# Altium PCB Copy of PCB1.PcbDoc (part 4 of 4)
Units mm, origin at the board's own origin, x right, y up, seen from the top; angles counter-clockwise.
Board outline 200 x 135 mm, 2 copper layers (Top Layer, Bottom Layer); 350 components, 150 nets, 843 pads, 244 vias.
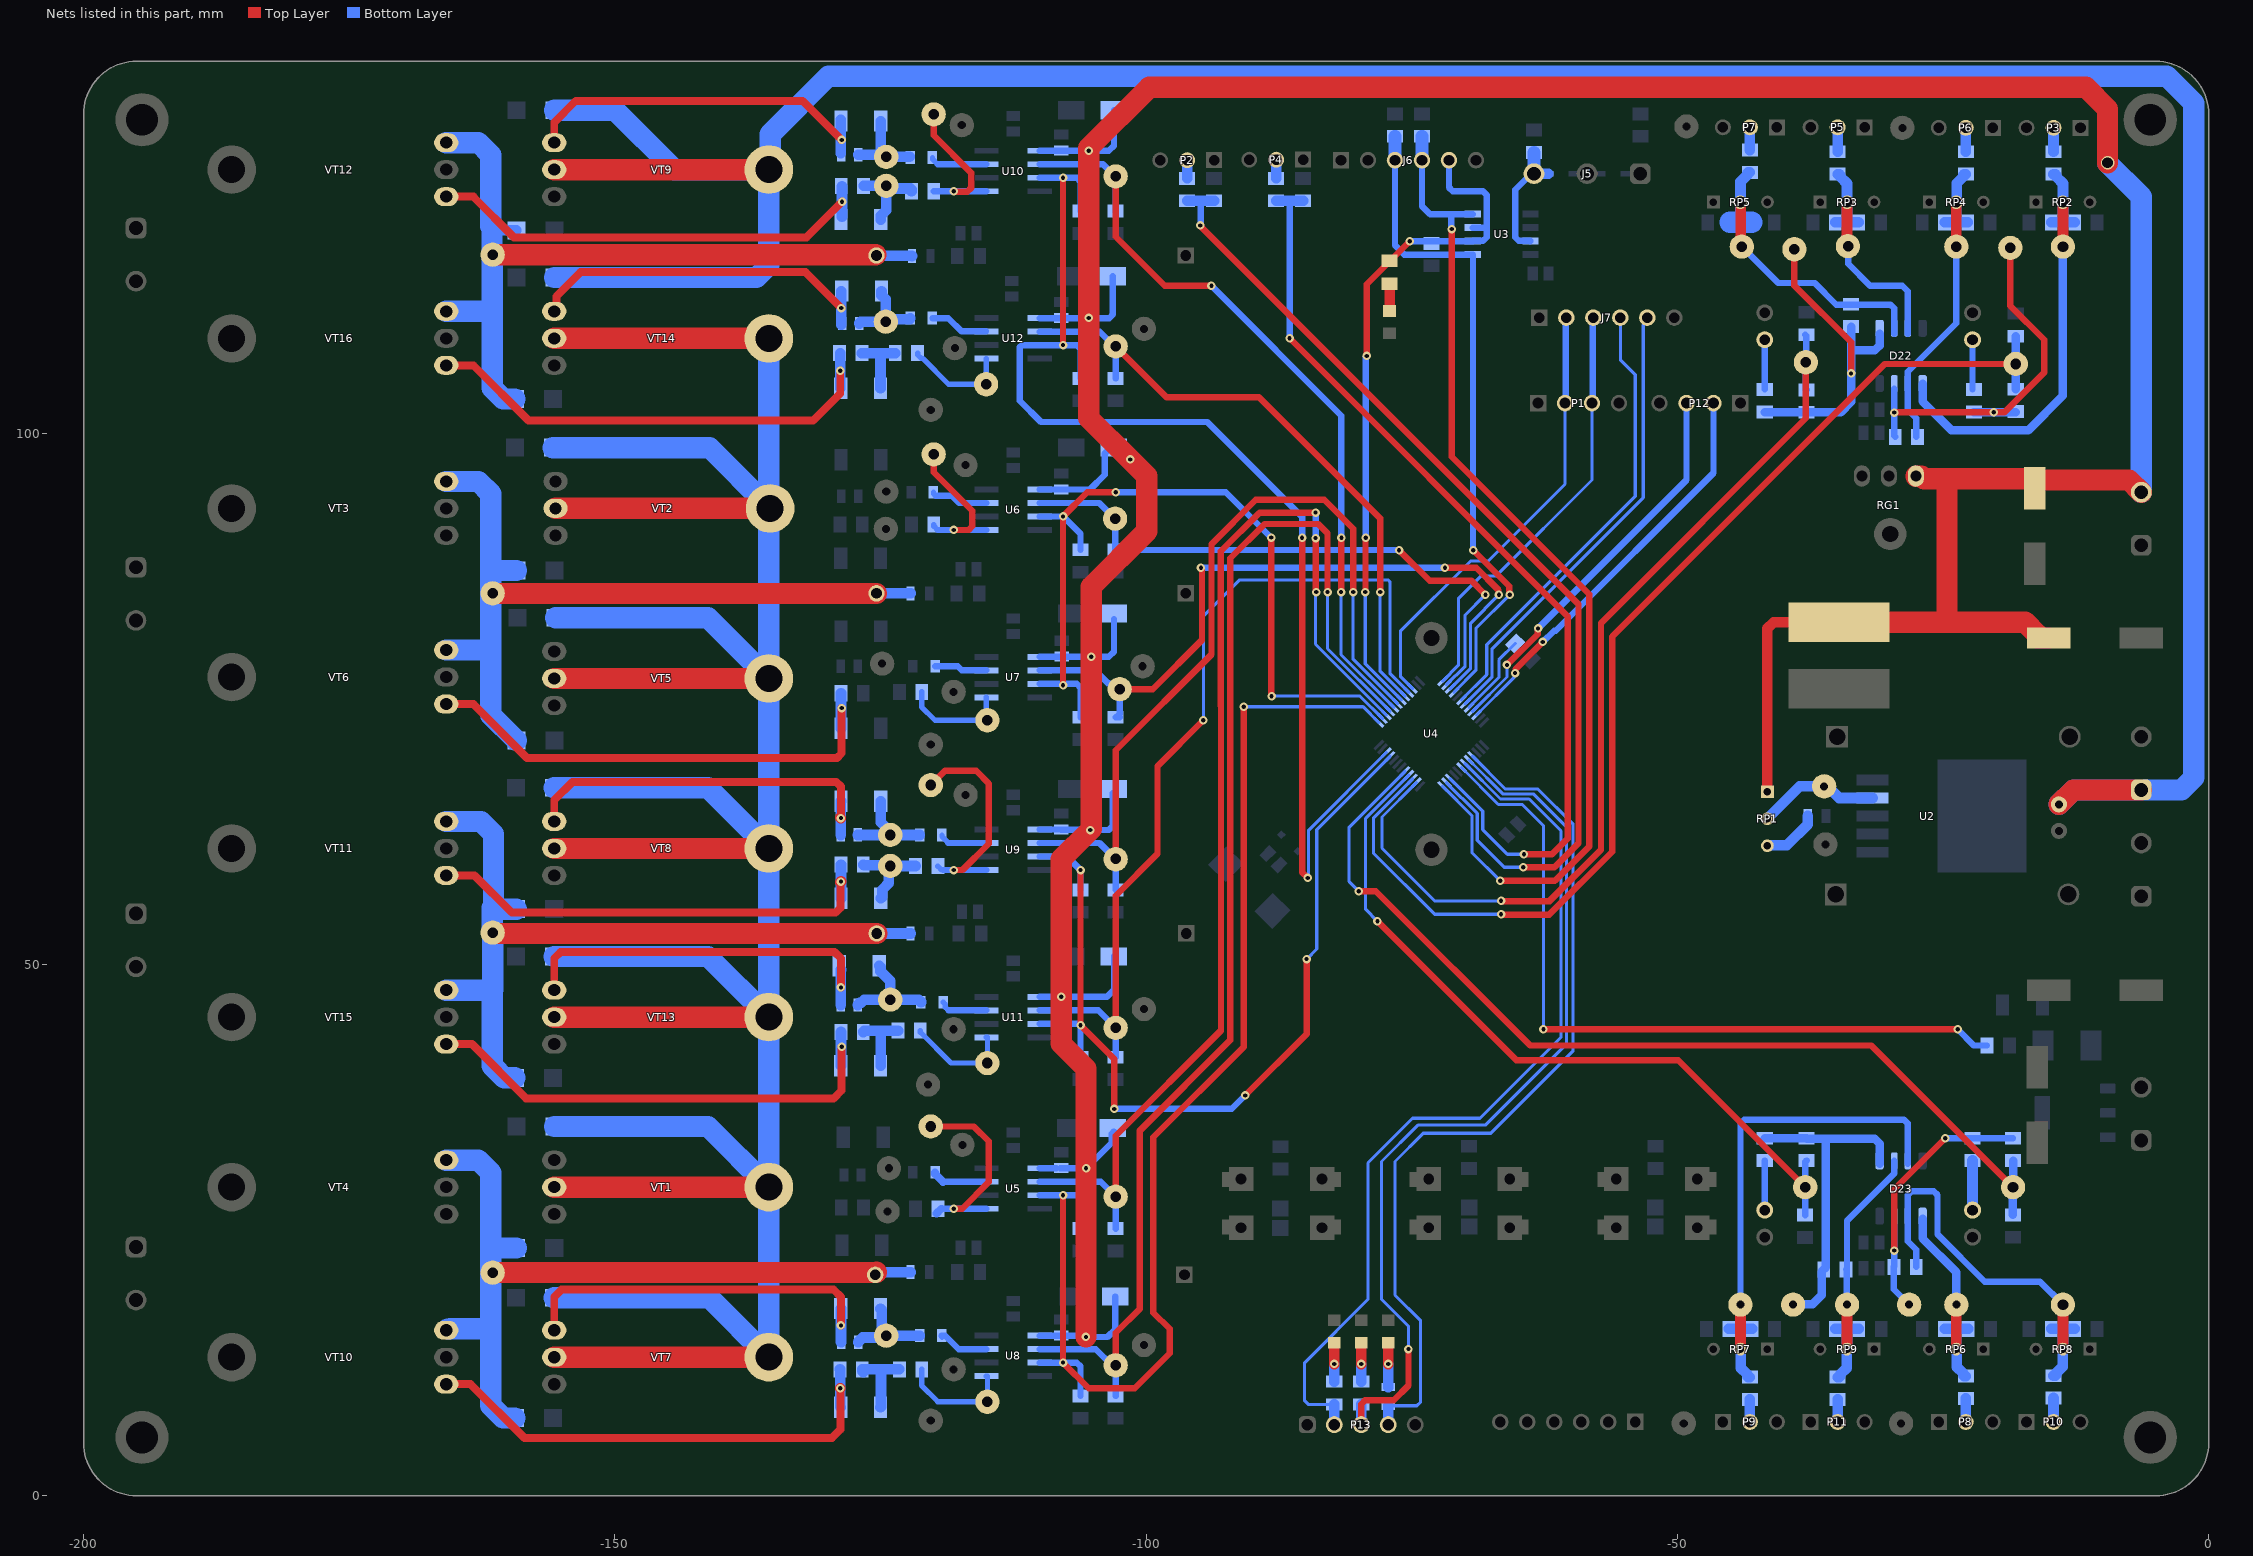
[diagram p3: the nets of this part, all layers, seen from the top]

## Via types
v1: diameter 0.8, hole 0.4, Top Layer to Bottom Layer, tented both sides, 119 vias
v2: diameter 1.27, hole 1, Top Layer to Bottom Layer, 115 vias
v3: diameter 1.8, hole 1, Top Layer to Bottom Layer, tented both sides, 6 vias
v4: diameter 1.27, hole 0.711, Top Layer to Bottom Layer, 3 vias
v5: diameter 0.8, hole 0.4, Top Layer to Bottom Layer, 1 vias

## Nets (pads, with @x,y where several pads share a name; then routed paths per layer and width w, separated by ;. In a path a pad name is that pad's centre, name@x,y a point inside that pad or via, vN(x,y) a via of type N, cw(c..) or ccw(c..) an arc to the next point about the centre after c; other vN are vias at no path point) (continued)
NetD9_2: D9.2 R27.1 VT6.G | length 47
  Top Layer w0.75: VT6.G@-165.862,74.509 -163.322,74.509 -158.256,69.443 -129.09,69.443 -128.651,69.882 v1(-128.651,74.128)
  Bottom Layer w1: R27.1@-128.721,75.525 -128.719,75.524 -128.719,72.224 D9.2@-128.718,72.223
NetD13_1: D13.1 R31.1 R34.2 TP35.1 | length 8.8
  Bottom Layer w1: R31.1@-127.087,14.438 -127.087,14.473 -126.665,14.895 -124.638,14.895 v2(-124.46,15.073) ; D13.1@-124.998,17.613 -124.873,17.488 -124.873,15.834 -124.46,15.421 v2(-124.46,15.073) ; R34.2@-121.319,15.073 v2(-124.46,15.073)
NetD13_2: D13.2 R31.2 VT7.G | length 36.5
  Top Layer w0.75: VT7.G@-155.702,15.581 -155.702,18.702 -155.013,19.391 -129.408,19.391 -128.72,18.702 v1(-128.72,16.026)
  Bottom Layer w1: D13.2@-128.748,17.613 -128.72,17.584 v1(-128.72,16.026) -128.72,14.467 R31.2@-128.691,14.438
NetD14_1: D14.1 R41.1 R43.2 TP49.1 | length 9.4
  Bottom Layer w1: R41.1@-127.127,62.19 v2(-124.079,62.19) ; D14.1@-124.968,65.365 -124.968,63.37 -124.079,62.481 v2(-124.079,62.19) ; R43.2@-121.319,62.19 v2(-124.079,62.19)
NetD14_2: D14.2 R41.2 VT8.G | length 36.1
  Top Layer w0.75: VT8.G@-155.702,63.46 -155.702,65.474 -153.991,67.185 -129.164,67.185 -128.724,66.746 v1(-128.724,63.778)
  Top Layer w1: v1@-128.778,63.831 v1(-128.724,63.778)
  Bottom Layer w1: R41.2@-128.731,62.19 -128.724,62.196 v1(-128.724,63.778) -128.724,65.359 D14.2@-128.718,65.365
NetD15_1: D15.1 R42.1 R44.2 TP50.1 | length 8.4
  Bottom Layer w1: R42.1@-127.087,126.198 -124.658,126.198 v4(-124.46,126) R44.2@-122.264,126 ; D15.1@-124.968,129.373 -124.968,126.856 -124.516,126.404 TP50.1@-124.516,126.056
  other v2: -124.46,126
NetD15_2: D15.2 R42.2 VT9.G | length 34.5
  Top Layer w0.75: VT9.G@-155.702,127.341 -155.702,129.248 -153.672,131.278 -132.334,131.278 v1(-128.651,127.595)
  Bottom Layer w1: R42.2@-128.748,126.329 D15.2@-128.748,129.5
NetD16_1: D16.1 R45.1 R48.2 | length 7.1
  Bottom Layer w1: R48.2@-126.608,11.644 -126.711,11.747 R48.2@-126.711,11.898 -124.95,11.898 R45.1@-123.225,11.898 ; D16.1@-124.998,8.342 -124.95,8.39 -124.95,11.644
NetD16_2: D16.2 R48.1 VT10.G | length 47
  Top Layer w0.75: VT10.G@-165.862,10.501 -163.576,10.501 -158.51,5.435 -129.584,5.435 -128.778,6.241 v1@-128.778,10.118
  Top Layer w1: v1(-128.78,10.12) v1@-128.778,10.118
  Bottom Layer w1: R48.1@-128.813,11.898 -128.78,11.866 v1(-128.78,10.12) -128.78,8.374 D16.2@-128.748,8.342
NetD17_1: D17.1 R51.1 R59.2 TP53.1 | length 8.4
  Bottom Layer w1: R59.2@-126.619,59.396 -126.556,59.333 -124.143,59.333 v2(-124.079,59.269) ; D17.1@-124.968,56.221 -124.843,56.346 -124.843,57.044 -124.218,57.67 -124.218,59.13 v2(-124.079,59.269) ; R51.1@-121.701,59.269 v2(-124.079,59.269)
NetD17_2: D17.2 R59.1 VT11.G | length 44.4
  Top Layer w0.75: VT11.G@-165.862,58.38 -163.195,58.38 -159.69,54.875 -129.217,54.875 -128.778,55.314 v1@-128.778,57.75
  Top Layer w1: v1@-128.778,57.75 v1(-128.719,57.809)
  Bottom Layer w1: R59.1@-128.721,59.396 -128.719,59.395 v1(-128.719,57.809) -128.719,56.222 D17.2@-128.718,56.221
NetD18_1: D18.1 R52.1 R60.2 TP54.1 | length 8.2
  Bottom Layer w1: R60.2@-126.584,123.277 v2(-124.46,123.277) ; D18.1@-124.968,120.102 -124.968,120.477 -124.46,120.985 v2(-124.46,123.277) ; R52.1@-122.082,122.769 -122.082,122.92 -122.193,123.031 -124.214,123.031 v2(-124.46,123.277)
NetD18_2: D18.2 R60.1 VT12.G | length 43.1
  Top Layer w0.75: VT12.G@-165.862,122.261 -163.322,122.261 -159.49,118.429 -131.976,118.429 v1(-128.621,121.784)
  Bottom Layer w1: D18.2@-128.621,120.356 v1(-128.621,121.784) R60.1@-128.621,123.212
NetD21_1: D21.1 R65.1 R75.2 TP59.1 | length 9.9
  Bottom Layer w1: R65.1@-127.127,46.188 -127.031,46.284 -127.031,46.319 -126.935,46.415 -126.822,46.415 -126.541,46.696 v2(-124.079,46.696) ; D21.1@-125.125,49.871 -125,49.746 -125,49.371 -124.079,48.45 v2(-124.079,46.696) ; R75.2@-121.192,46.442 -121.192,46.492 -121.396,46.696 v2(-124.079,46.696)
NetD21_2: D21.2 R65.2 VT13.G | length 36.5
  Top Layer w0.75: VT13.G@-155.702,47.585 -155.702,50.579 -155.096,51.185 -129.33,51.185 -128.724,50.579 v1(-128.724,47.839)
  Bottom Layer w1: R65.2@-128.731,46.188 -128.724,46.194 v1(-128.724,47.839) -128.724,49.484 D21.2@-128.718,49.49
NetD22_1: D22.1 R54.2 R63.2 R64.2 TP6.1 | length 33.5
  Top Layer w0.6: v2(-38.989,117.308) -38.989,113.879 -33.655,108.545 v1(-33.655,105.624)
  Bottom Layer w0.8: R63.2@-41.783,101.976 R64.2@-37.846,101.976 -34.636,101.976 -33.655,102.957 v1(-33.655,105.624) -33.655,107.783 ; R54.2@-33.655,110.034 -33.655,107.783 ; D22.1@-30.981,109.367 -30.981,108.252 -31.45,107.783 -33.655,107.783
NetD22_2: D22.2 R54.1 R73.2 R74.1 R77.1 RP5.2 TP12.1 | length 30.6
  Top Layer w1: v2(-44.069,121.753) -44.031,121.715 -44.031,117.651 v2(-43.942,117.562)
  Bottom Layer w0.6: v2(-43.942,117.562) -40.513,114.133 -37.084,114.133 -35.052,112.101 -29.942,112.101 -29.591,111.75 D22.2@-29.591,109.875 D22.2@-29.591,109.367
  Bottom Layer w1: -44.023,119.848 -44.069,119.894 -44.069,123.658 -43.434,124.293 -43.434,124.444 -43.331,124.547 R73.2@-43.18,124.547
  Bottom Layer w2: R74.1@-45.05,119.848 -44.023,119.848 R77.1@-42.996,119.848
NetD22_3: D22.3 R57.2 R58.1 R67.2 RP3.2 TP10.1 | length 23.7
  Top Layer w1: v2(-34.036,121.753) -34.036,117.689 TP10.1@-33.953,117.606
  Bottom Layer w0.6: D22.3@-28.321,109.367 -28.321,113.371 -28.829,113.879 -31.877,113.879 -33.934,115.936 v2(-33.934,117.587) ; v2(-33.934,117.587) TP10.1@-33.953,117.606 v2(-33.934,117.587)
  Bottom Layer w1: R58.1@-35.144,119.848 -34.036,119.848 ; R57.2@-34.925,124.385 -34.774,124.385 -34.671,124.282 -34.671,124.131 -34.036,123.496 v2(-34.036,121.753) -34.036,119.848 ; R67.2@-32.963,119.848 -34.036,119.848
NetD22_5: D22.5 R55.2 R56.1 R66.2 RP2.2 TP9.GG | length 42.8
  Top Layer w1: v2(-13.716,117.562) v2(-13.716,121.753)
  Bottom Layer w0.8: D22.5@-26.931,104.675 -26.931,102.994 -24.212,100.275 -16.975,100.275 -13.716,103.534 v2(-13.716,117.562)
  Bottom Layer w1: R56.1@-14.824,119.848 -13.716,119.848 ; R55.2@-14.605,124.385 -14.454,124.385 -14.351,124.282 -14.351,124.131 -13.716,123.496 v2(-13.716,121.753) -13.716,119.848 ; R66.2@-12.608,119.848 -13.716,119.848
NetD22_6: D22.6 R53.1 R71.2 R72.1 R76.1 RP4.2 TP11.1 | length 31.5
  Top Layer w1: v2(-23.749,117.562) v2(-23.749,121.748)
  Bottom Layer w0.6: R53.1@-27.524,99.655 -27.524,101.398 -28.321,102.195 D22.6@-28.321,104.675 -28.321,105.781 -23.749,110.353 v2(-23.749,117.562)
  Bottom Layer w1: R72.1@-24.857,119.848 -23.766,119.848 ; R71.2@-22.86,124.385 -23.011,124.385 -23.114,124.282 -23.114,124.131 -23.711,123.534 -23.711,121.786 v2(-23.749,121.748) -23.749,119.865 -23.766,119.848 ; R76.1@-22.676,119.848 -23.766,119.848
NetD22_7: D22.7 R53.2 R61.2 R62.2 TP5.1 | length 37.2
  Top Layer w0.6: v1(-29.591,101.941) -29.574,101.958 -20.245,101.958 v1(-20.228,101.976) -19.224,101.976 -15.494,105.706 -15.494,108.799 -18.669,111.974 v2(-18.669,117.435)
  Bottom Layer w0.6: D22.7@-29.591,104.167 -29.591,99.747 R53.2@-29.499,99.655
  Bottom Layer w0.8: R61.2@-22.098,101.976 v1(-20.228,101.976) R62.2@-18.161,101.976
NetD23_1: D23.1 R84.2 R90.2 R92.2 TP16.1 | length 30.8
  Bottom Layer w0.8: R90.2@-41.783,33.65 R92.2@-37.846,33.65 ; TP16.1@-39.116,17.994 -39.085,18.025 -37.275,18.025 -36.433,18.867 -36.433,21.093 -36.027,21.499 -36.027,33.615 ; R92.2@-37.846,33.615 -36.027,33.615 ; D23.1@-30.981,31.262 -30.981,33.146 -31.45,33.615 -36.027,33.615
NetD23_2: D23.2 R84.1 R98.2 R100.1 R102.1 RP9.2 TP22.1 | length 26.8
  Top Layer w1: RP9.2@-34.036,13.803 TP22.1@-34.036,17.994
  Bottom Layer w0.6: R84.1@-34.128,21.296 -34.036,21.204 -34.082,21.158 -34.082,18.04 TP22.1@-34.036,17.994 ; R84.1@-34.036,21.296 -34.036,25.889 -29.591,30.334 D23.2@-29.591,31.516
  Bottom Layer w1: R102.1@-35.144,15.708 -34.036,15.708 ; R98.2@-34.925,11.171 -34.774,11.171 -34.671,11.274 -34.671,11.425 -34.074,12.022 -34.074,13.765 RP9.2@-34.036,13.803 -34.036,15.708 ; R100.1@-32.928,15.708 -34.036,15.708
NetD23_3: D23.3 R86.2 R88.1 R94.2 RP7.2 TP20.1 | length 48.3
  Top Layer w1: RP7.2@-44.069,13.803 TP20.1@-44.069,17.994
  Bottom Layer w0.6: TP20.1@-44.069,17.994 -44.069,35.042 -43.718,35.393 -28.672,35.393 -28.321,35.042 D23.3@-28.321,31.262
  Bottom Layer w1: R94.2@-45.177,15.708 -44.069,15.708 ; R86.2@-43.18,11.171 -43.331,11.171 -43.434,11.274 -43.434,11.425 -44.031,12.022 -44.031,13.765 RP7.2@-44.069,13.803 -44.069,15.708 ; R88.1@-42.961,15.708 -44.069,15.708
NetD23_5: D23.5 R85.2 R87.1 R93.2 RP6.2 TP19.1 | length 20.7
  Top Layer w1: RP6.2@-23.749,13.803 TP19.1@-23.749,17.994
  Bottom Layer w0.8: D23.5@-26.931,26.062 -26.931,24.224 -23.749,21.042 TP19.1@-23.749,17.994
  Bottom Layer w1: R93.2@-24.857,15.708 -23.749,15.708 ; R85.2@-22.86,11.263 -23.011,11.263 -23.114,11.366 -23.114,11.517 -23.711,12.114 -23.711,13.765 RP6.2@-23.749,13.803 -23.749,15.708 ; R87.1@-22.641,15.708 -23.749,15.708
NetD23_6: D23.6 R83.1 R97.2 R99.1 R101.1 RP8.2 TP21.1 | length 39.6
  Top Layer w1: RP8.2@-13.716,13.803 v2(-13.716,17.994)
  Bottom Layer w0.6: R83.1@-27.524,21.55 -27.524,23.166 -28.321,23.963 -28.321,28.311 -27.97,28.662 -25.878,28.662 -25.527,28.311 -25.527,24.598 -21.082,20.153 -15.875,20.153 v2(-13.716,17.994)
  Bottom Layer w1: R101.1@-14.824,15.708 R99.1@-12.608,15.708 ; R97.2@-14.605,11.298 -14.454,11.298 -14.351,11.401 -14.351,11.552 -13.754,12.149 -13.754,13.765 RP8.2@-13.716,13.803 -13.716,15.614
NetD23_7: D23.7 R83.2 R89.2 R91.2 TP15.1 | length 27.6
  Top Layer w0.6: v1(-29.591,23.074) -29.591,28.859 v1(-24.8,33.65)
  Bottom Layer w0.6: D23.7@-29.591,26.062 v1(-29.591,23.074) -29.591,21.585 R83.2@-29.626,21.55 -29.626,19.426 TP15.1@-28.194,17.994 ; v1(-24.8,33.65) R89.2@-22.225,33.65 R91.2@-18.415,33.65
NetD24_1: D24.1 R68.1 R78.2 TP60.1 | length 8.1
  Bottom Layer w1: R68.1@-127,110.323 -127,110.358 -126.858,110.5 v2(-124.5,110.5) ; D24.1@-124.901,113.371 -124.901,112.996 -124.5,112.595 v2(-124.5,110.5) ; R78.2@-122.208,110.831 -122.258,110.781 -122.258,110.736 -124.264,110.736 v2(-124.5,110.5)
NetD24_2: D24.2 R68.2 VT14.G | length 33.8
  Top Layer w0.75: VT14.G@-155.702,111.466 -155.504,111.664 -155.504,112.871 -153.226,115.149 -132.07,115.149 v1(-128.691,111.77)
  Bottom Layer w1: R68.2@-128.691,110.196 v1(-128.691,111.77) D24.2@-128.691,113.344
NetD25_1: D25.1 R103.1 R105.2 | length 6.5
  Bottom Layer w1: R105.2@-126.619,43.648 -126.619,43.672 -126.516,43.775 -124.968,43.775 R103.1@-123.352,43.775 ; D25.1@-124.968,40.473 -124.968,43.648
NetD25_2: D25.2 R105.1 VT15.G | length 46.9
  Top Layer w0.75: VT15.G@-165.862,42.505 -163.449,42.505 -158.341,37.397 -129.408,37.397 -128.651,38.154 v1(-128.651,42.251)
  Bottom Layer w1: R105.1@-128.721,43.648 -128.719,43.647 -128.719,42.251 -128.719,40.474 D25.2@-128.718,40.473
NetD26_1: D26.1 R104.1 R106.2 | length 6.4
  Bottom Layer w1: R106.2@-126.746,107.529 -124.998,107.529 ; D26.1@-124.998,104.227 -124.998,107.529 ; R104.1@-123.606,107.529 -124.998,107.529
NetD26_2: D26.2 R106.1 VT16.G | length 45.7
  Top Layer w0.75: VT16.G@-165.862,106.386 -163.322,106.386 -158.129,101.193 -131.332,101.193 -128.787,103.738 v1(-128.787,105.878)
  Bottom Layer w1: D26.2@-128.787,104.236 v1(-128.787,105.878) R106.1@-128.787,107.52
NetD29_1: D29.1 R113.1 | length 4.2
  Top Layer w1: v1(-77.216,12.406) D29.1@-77.216,14.404
  Bottom Layer w1: R113.1@-77.216,10.221 v1(-77.216,12.406)
NetD30_1: D30.1 R114.1 | length 3.7
  Top Layer w1: v1(-79.756,12.406) D30.1@-79.756,14.404
  Bottom Layer w1: R114.1@-79.756,10.748 v1(-79.756,12.406)
NetD31_1: D31.1 R115.1 | length 3.7
  Top Layer w1: v1(-82.296,12.406) D31.1@-82.296,14.404
  Bottom Layer w1: R115.1@-82.296,10.748 v1(-82.296,12.406)
NetD32_2: D32.2 D34.2 R29.2 R30.2 TP43.1 VT4.S VT10.S | length 75.2
  Top Layer w2: TP43.1@-161.544,21.042 -161.522,21.02 -125.398,21.02 R29.2@-125.376,21.042
  Bottom Layer w1: R29.2@-125.503,20.788 -125.398,20.893 -125.009,20.893 -124.86,21.042 R30.2@-122.161,21.042
  Bottom Layer w2: VT4.S@-165.862,31.583 -162.843,31.583 -161.812,30.553 ; VT10.S@-165.719,15.692 -165.497,15.692 -165.481,15.708 -161.671,15.708 ; -161.671,30.411 -161.671,21.248 -161.5,21.077 -161.5,20.923 -161.671,20.752 -161.671,15.708 ; -161.471,23.382 -161.417,23.328 D32.2@-159.282,23.328 ; D34.2@-159.409,7.326 -160.499,7.326 -161.671,8.498 -161.671,15.708
  other v2: -161.5,21
NetD36_2: D36.2 D38.2 R107.2 R108.2 TP67.1 VT11.S VT15.S | length 75.1
  Top Layer w2: TP67.1@-161.544,52.919 v2(-125.349,52.919)
  Bottom Layer w1: v2(-125.349,52.919) R108.2@-122.161,52.919
  Bottom Layer w2: VT15.S@-165.862,47.585 -161.544,47.585 ; VT11.S@-165.862,63.46 -162.589,63.46 -161.417,62.288 -161.417,55.205 D36.2@-159.282,55.205 ; -161.544,40.473 -161.544,47.585 ; TP67.1@-161.544,53 -161.544,55.332 ; v2(-161.5,53) -161.5,47.629 -161.544,47.585 ; -161.403,40.332 -160.401,39.33 D38.2@-159.409,39.33
NetD40_2: D40.2 D42.2 R32.2 R33.2 TP44.1 VT3.S VT6.S | length 74.9
  Top Layer w2: TP44.1@-161.544,84.923 v2(-125.376,84.923)
  Bottom Layer w1: v2(-125.376,84.923) R33.2@-122.161,84.923
  Bottom Layer w2: VT6.S@-165.862,79.589 -161.671,79.589 ; VT3.S@-165.862,95.464 -162.843,95.464 -161.671,94.292 -161.671,87.082 ; TP44.1@-161.671,84.923 -161.671,87.082 ; v2(-161.5,84.923) -161.5,84.846 -161.671,84.675 -161.671,79.589 ; D42.2@-159.27,71.08 -161.671,73.481 -161.671,79.589 ; D40.2@-159.27,87.082 -161.671,87.082
NetD44_2: D44.2 D46.2 R109.2 R110.2 TP68.1 VT12.S VT16.S | length 75
  Top Layer w2: TP68.1@-161.544,116.8 v2(-161.5,116.8) R109.2@-125.453,116.8
  Bottom Layer w1: -161.555,119.351 -161.29,119.086 D44.2@-159.27,119.086 ; v2(-125.376,116.723) -125.351,116.698 -122.059,116.698 R110.2@-122.034,116.673
  Bottom Layer w2: VT16.S@-165.862,111.466 -161.744,111.466 ; VT12.S@-165.862,127.341 -162.843,127.341 -161.671,126.169 -161.671,119.467 -161.555,119.351 -161.555,116.855 v2(-161.5,116.8) TP68.1@-161.5,116.877 ; -161.544,104.256 TP68.1@-161.544,116.679 ; -161.403,104.114 -160.499,103.211 D46.2@-159.409,103.211
NetD47_1: D47.1 R119.1 | length 2.6
  Top Layer w1: D47.1@-77.089,111.5 R119.1@-77.089,114.073
NetJ5_3: J5.3 R5.1 U3.7 Z2.1 | length 11.8
  Bottom Layer w0.6: U3.7@-63.836,118.07 -63.861,118.095 -64.927,118.095 -65.278,118.446 -65.278,122.896 -63.754,124.42 J5.3@-63.5,124.42
  Bottom Layer w1: J5.3@-63.5,124.42 Z2.1@-62.16,124.42
  Bottom Layer w1.2: J5.3@-63.5,124.42 R5.1@-63.5,126.417
NetJ6_3: J6.3 R4.1 U3.1 U4.40 | length 62.7
  Top Layer w0.6: v1@-69.177,88.949 -65.824,85.596 -65.824,84.834 v1(-65.786,84.796)
  Bottom Layer w0.3: U4.40@-71.031,75.604 -68.961,77.674 -68.961,81.621 v1(-65.786,84.796)
  Bottom Layer w0.6: J6.3@-76.581,125.69 -76.581,117.689 -75.692,116.8 U3.1@-69.26,116.8 -69.238,116.778 -69.238,89.01 v1(-69.215,88.987)
  Bottom Layer w1.2: J6.3@-76.581,125.69 R4.1@-76.581,127.941
NetJ6_4: J6.4 R3.1 U3.4 U4.12 | length 97.4
  Top Layer w0.6: v1(-71.247,119.213) -71.247,97.797 -58.293,84.843 -58.293,61.107 -61.528,57.872 v1(-66.675,57.872)
  Bottom Layer w0.3: U4.12@-72.091,66.765 -69.342,64.016 -69.342,60.539 v1(-66.675,57.872)
  Bottom Layer w0.6: J6.4@-74.041,125.69 -74.041,121.372 -73.279,120.61 -71.285,120.61 ; v1(-71.247,119.213) -71.285,119.251 -71.285,120.61 ; U3.4@-69.26,120.61 -71.285,120.61
  Bottom Layer w1.2: J6.4@-74.041,125.69 R3.1@-74.041,127.941
NetJ6_5: J6.5 R9.2 R119.2 U3.2 U3.3 U4.31 | length 65.3
  Top Layer w0.6: v1(-79.375,85.05) -79.35,85.075 -79.35,90.125 v1(-79.325,90.15) ; v1(-79.248,107.275) -79.248,114.006 v1(-75.184,118.07)
  Bottom Layer w0.3: v1(-79.375,85.05) -79.375,78.292 U4.31@-75.98,74.897
  Bottom Layer w0.6: v1(-79.325,90.15) -79.325,107.144 -79.248,107.221 v1(-79.248,107.275) ; v1(-75.184,118.07) U3.2@-69.26,118.07 -69.235,118.095 -68.295,118.095 -67.944,118.446 -67.944,119.34 ; J6.5@-71.501,125.69 -71.501,123.12 -71.15,122.769 -68.295,122.769 -67.944,122.418 -67.944,119.468 -68.072,119.34 U3.3@-69.26,119.34
NetJ7_2: J7.2 P1.2 U4.34 | length 42.8
  Bottom Layer w0.3: U4.34@-74.92,75.958 -76.073,77.111 -76.073,81.367 -69.469,87.971 -67.818,87.971 -60.579,95.21 P1.2@-60.579,102.83 P1.2@-60.516,102.894 ; J7.2@-60.516,110.813 J7.2@-60.452,110.877
  Bottom Layer w0.6: P1.2@-60.516,102.894 J7.2@-60.516,110.813
NetJ7_3: J7.3 P1.3 U4.37 | length 40.9
  Bottom Layer w0.3: U4.37@-72.091,76.665 -70.612,78.144 -70.612,84.415 -68.453,86.574 -67.056,86.574 -58.039,95.591 P1.3@-58.039,102.83 P1.3@-57.976,102.893 ; J7.3@-57.976,110.813 J7.3@-57.912,110.877
  Bottom Layer w0.6: P1.3@-57.976,102.893 J7.3@-57.976,110.813
NetJ7_4: J7.4 U4.42 | length 43.3
  Bottom Layer w0.3: U4.42@-70.324,74.897 -70.324,74.9 -67.945,77.279 -67.945,80.097 -53.975,94.067 -53.975,105.497 -55.372,106.894 J7.4@-55.372,110.877
NetJ7_5: J7.5 U4.43 | length 43.4
  Bottom Layer w0.3: U4.43@-69.97,74.543 -67.437,77.076 -67.437,79.716 -53.213,93.94 -53.213,110.158 -52.832,110.539 J7.5@-52.832,110.877
NetLED1_2: LED1.2 R61.1 | length 4.7
  Bottom Layer w0.6: R61.1@-22.225,104.135 v2(-22.225,108.799)
NetLED2_2: LED2.2 R63.1 | length 4.7
  Bottom Layer w0.6: R63.1@-41.783,104.13 LED2.2@-41.783,108.794
NetLED3_2: LED3.2 R89.1 | length 4.7
  Bottom Layer w1: v2(-22.225,26.884) R89.1@-22.225,31.548
NetLED4_2: LED4.2 R90.1 | length 4.7
  Bottom Layer w0.6: v2(-41.783,26.884) R90.1@-41.783,31.548
NetP2_2: P2.2 R20.2 | length 1.7
  Bottom Layer w1: R20.2@-96.139,123.982 P2.2@-96.139,125.69
NetP3_2: P3.2 R55.1 | length 2.3
  Bottom Layer w1: R55.1@-14.605,126.487 P3.2@-14.605,128.738
NetP4_2: P4.2 R38.2 | length 1.8
  Bottom Layer w1: R38.2@-87.757,123.982 P4.2@-87.757,125.736
NetP5_2: P5.2 R57.1 | length 2.3
  Bottom Layer w1: R57.1@-34.925,126.487 P5.2@-34.925,128.784
NetP6_2: P6.2 R71.1 | length 2.3
  Bottom Layer w1: R71.1@-22.86,126.487 P6.2@-22.86,128.738
NetP7_2: P7.2 R73.1 | length 2.1
  Bottom Layer w1: R73.1@-43.18,126.649 P7.2@-43.18,128.784
NetP8_2: P8.2 R85.1 | length 2.2
  Bottom Layer w1: v2(-22.86,6.945) R85.1@-22.86,9.161
NetP9_2: P9.2 R86.1 | length 2.3
  Bottom Layer w1: P9.2@-43.18,6.818 R86.1@-43.18,9.069
  other v2: -43.18,6.945
NetP10_2: P10.2 R97.1 | length 2.3
  Bottom Layer w1: v2(-14.605,6.945) R97.1@-14.605,9.196
NetP11_2: P11.2 R98.1 | length 2.3
  Bottom Layer w1: P11.2@-34.925,6.818 R98.1@-34.925,9.069
  other v2: -34.925,6.945
NetP12_2: P12.2 U4.46 | length 38.6
  Top Layer w0.6: v1(-65.278,77.43) -65.24,77.468 -65.24,77.775 v1@-62.702,80.313
  Bottom Layer w0.3: U4.46@-68.909,73.483 -65.374,77.018 -65.374,77.334 v1(-65.278,77.43)
  Bottom Layer w0.6: v1(-62.664,80.351) -61.608,81.407 -61.458,81.407 -46.609,96.256 P12.2@-46.609,102.83
NetP12_3: P12.3 U4.45 | length 37.3
  Top Layer w0.6: v1(-66.04,78.192) -63.157,81.075 -63.157,81.583 v1(-63.119,81.621)
  Bottom Layer w0.3: U4.45@-69.263,73.836 -66.04,77.059 v1(-66.04,78.192)
  Bottom Layer w0.6: v1(-63.119,81.621) -49.149,95.591 P12.3@-49.149,102.83
NetP13_2: P13.2 R115.2 U4.6 | length 83.8
  Bottom Layer w0.3: R115.2@-82.296,8.596 -84.739,8.596 -85.09,8.947 -85.09,12.533 -79.121,18.502 -79.121,31.329 -74.93,35.52 -68.58,35.52 -60.96,43.14 -60.96,62.571 -63.96,65.571 -66.655,65.571 U4.6@-69.97,68.887
  Bottom Layer w1: P13.2@-82.296,6.691 R115.2@-82.296,8.596
NetP13_3: P13.3 R114.2 U4.5 | length 85.3
  Top Layer w0.6: P13.3@-79.756,6.691 -79.756,8.626 -79.405,8.977 -76.708,8.977 -75.311,10.374 v1(-75.311,13.803)
  Bottom Layer w0.3: v1(-75.311,13.803) -75.311,15.962 -77.851,18.502 -77.851,31.456 -74.422,34.885 -68.072,34.885 -60.452,42.505 -60.452,62.952 -63.53,66.03 -66.406,66.03 U4.5@-69.616,69.24
  Bottom Layer w1: P13.3@-79.756,6.691 R114.2@-79.756,8.596
NetP13_4: P13.4 R113.2 U4.4 | length 83.1
  Bottom Layer w0.3: R113.2@-77.216,8.469 -74.519,8.469 -74.168,8.82 -74.168,16.47 -76.581,18.883 -76.581,31.456 -73.914,34.123 -67.564,34.123 -59.817,41.87 -59.817,63.206 -63.119,66.508 -66.177,66.508 U4.4@-69.263,69.594
  Bottom Layer w1: P13.4@-77.216,6.691 R113.2@-77.216,8.469
NetR1_2: R1.2 RP1.3 | length 5.4
  Bottom Layer w1: RP1.3@-41.534,61.174 -41.496,61.212 -39.713,61.212 -37.719,63.206 R1.2@-37.719,63.968
NetR2_1: R2.1 U4.44 | length 7.8
  Bottom Layer w0.3: U4.44@-69.616,74.19 -66.802,77.004 -66.802,78.662 R2.1@-65.259,80.205
NetR7_1: R7.1 U6.7 | length 5.5
  Bottom Layer w0.5: R7.1@-120.015,94.448 -120.015,94.298 R7.1@-119.815,94.098
  Bottom Layer w0.6: R7.1@-119.815,94.098 -118.268,94.098 -117.602,93.432 U6.7@-115.036,93.432
NetR10_1: R10.1 U4.7 | length 71.5
  Top Layer w0.6: v1(-62.611,43.902) v1(-23.622,43.902)
  Bottom Layer w0.3: U4.7@-70.324,68.533 -66.844,65.054 -64.586,65.054 -62.611,63.079 v1(-62.611,43.902)
  Bottom Layer w0.6: v1(-23.622,43.902) -22.098,42.378 R10.1@-20.863,42.378
NetR12_2: R12.2 TP28.1 U4.38 U6.2 | length 57.2
  Top Layer w0.6: v1(-76.2,88.987) -73.313,86.1 -69.376,86.1 v1(-68.072,84.796)
  Bottom Layer w0.3: U4.38@-71.738,76.311 -69.977,78.072 -69.977,82.891 v1(-68.072,84.796)
  Bottom Layer w0.6: U6.2@-110.008,93.432 -104.399,93.432 v2(-102.923,91.956) -102.923,89.075 -102.853,89.004 -76.217,89.004 v1(-76.2,88.987)
NetR13_2: R13.2 R24.2 U4.26 U6.3 U7.3 | length 77.2
  Top Layer w0.6: v1(-107.823,76.287) v1(-107.823,92.162) -105.537,94.448 v1(-102.87,94.448) ; v1@-88.225,90.121 -88.213,90.108 -88.213,75.263 v1(-88.2,75.25)
  Bottom Layer w0.3: v1(-88.2,75.25) -88.179,75.271 -79.89,75.271 U4.26@-77.748,73.129
  Bottom Layer w0.6: U7.3@-110.008,76.414 -106.523,76.414 -106.172,76.063 R24.2@-106.172,73.274 ; U6.3@-110.008,92.162 -107.809,92.162 -106.172,90.525 R13.2@-106.172,89.022 ; v1(-102.87,94.448) -92.498,94.448 v1(-88.225,90.175)
NetR14_1: R14.1 U5.7 | length 5.3
  Bottom Layer w0.6: -119.115,29.551 U5.7@-115.036,29.551
  Bottom Layer w0.75: R14.1@-119.854,30.44 -119.854,30.29 -119.115,29.551
NetR15_2: R15.2 TP32.1 U6.5 | length 16.1
  Top Layer w0.6: TP32.1@-120.269,98.385 TP32.1@-119.778,97.894 ; v2(-120,98) -119.98,97.98 -119.98,96.331 -116.35,92.701 -116.35,91.243 -116.701,90.892 v1(-118.11,90.892)
  Bottom Layer w0.5: R15.2@-119.98,91.4 -119.98,91.249 R15.2@-119.623,90.892
  Bottom Layer w0.6: R15.2@-119.623,90.892 v1(-118.11,90.892) U6.5@-115.036,90.892
NetR17_2: R17.2 TP27.1 U4.27 U5.2 | length 107.8
  Top Layer w0.6: v2(-102.87,28.154) -102.87,33.869 -92.959,43.78 -92.959,74.356 -92.964,74.361 -92.964,88.886 -89.325,92.525 v1(-84.05,92.525) ; v1(-84.059,90.13) -84.03,90.1 -84.03,85.08 v1(-84,85.05)
  Bottom Layer w0.3: v1(-84,85.05) -84.059,84.991 -84.059,80.147 U4.27@-77.395,73.483
  Bottom Layer w0.6: U5.2@-110.008,29.551 -104.267,29.551 v2(-102.87,28.154) R17.2@-102.87,25.141 ; v1(-84.059,90.13) -84.055,90.135 -84.055,92.52 v1(-84.05,92.525)
NetR18_2: R18.2 R40.2 U4.25 U5.3 U8.3 | length 120
  Top Layer w0.6: v1(-107.823,28.281) v1(-107.823,12.533) -105.41,10.12 -101.08,10.12 -97.79,13.41 -97.79,15.708 -99.314,17.232 -99.314,33.742 -90.827,42.229 -90.827,74.233 v1(-90.805,74.255)
  Bottom Layer w0.3: v1(-90.805,74.255) -79.581,74.255 U4.25@-78.102,72.776
  Bottom Layer w0.6: U8.3@-110.008,12.533 v1(-107.823,12.533) -106.523,12.533 -106.172,12.182 R40.2@-106.172,9.393 ; U5.3@-110.008,28.281 v1(-107.823,28.281) -106.523,28.281 -106.172,27.93 R18.2@-106.172,25.141
NetR20_1: R20.1 R22.1 U4.11 | length 95.9
  Top Layer w0.6: v1(-94.9,119.55) -94.9,119.498 -59.309,83.907 -59.309,61.416 -61.575,59.15 v1(-64.5,59.15)
  Bottom Layer w0.3: U4.11@-71.738,67.119 -68.834,64.215 -68.834,61.682 -66.302,59.15 v1(-64.5,59.15)
  Bottom Layer w0.6: v1(-94.9,119.55) -94.869,119.581 -94.869,121.88
  Bottom Layer w1: R20.1@-96.139,121.88 -94.869,121.88 R22.1@-93.599,121.88
NetR21_1: R21.1 U7.7 | length 5
  Bottom Layer w0.6: R21.1@-119.854,78.065 -117.729,78.065 -117.348,77.684 U7.7@-115.036,77.684
NetR23_2: R23.2 TP38.1 U4.39 U7.2 | length 68
  Top Layer w0.6: v2(-102.489,75.906) -99.369,75.906 -94.745,80.53 -94.745,87.182 -94.845,87.282 v1(-94.845,87.336) ; v1(-71.882,87.336) -68.936,87.336 -66.84,85.24 -66.84,84.834 v1(-66.802,84.796)
  Bottom Layer w0.3: U4.39@-71.384,75.958 -69.469,77.873 -69.469,82.129 v1(-66.802,84.796)
  Bottom Layer w0.6: U7.2@-110.008,77.684 -104.8,77.684 -103.6,76.484 -103.523,76.484 -102.945,75.906 v2(-102.489,75.906) -102.489,73.577 -102.792,73.274 R23.2@-102.87,73.274 R23.2@-102.489,73.274 ; v1(-94.845,87.336) v1(-71.882,87.336)
NetR25_2: R25.2 TP31.1 U5.5 | length 19.1
  Top Layer w0.6: v2(-120.269,34.758) -116.208,34.758 -114.8,33.35 -114.8,29.525 -117.314,27.011 v1(-118.11,27.011)
  Bottom Layer w0.6: R25.2@-119.277,27.011 v1(-118.11,27.011) U5.5@-115.036,27.011
  Bottom Layer w0.75: R25.2@-119.736,26.552 R25.2@-119.277,27.011
NetR26_2: R26.2 TP42.1 U7.5 | length 10.3
  Bottom Layer w0.5: R26.2@-121.123,75.652 -121.123,74.248 -119.86,72.985 v2(-114.935,72.985) -115.036,73.086 U7.5@-115.036,75.144
NetR34_1: R34.1 U8.7 | length 4.9
  Bottom Layer w0.5: R34.1@-119.219,14.923 R34.1@-119.219,15.073
  Bottom Layer w0.6: R34.1@-119.253,15.073 R34.1@-119.219,15.073 -118.895,15.073 -117.625,13.803 U8.7@-115.036,13.803
NetR37_2: R37.2 TP37.1 U4.28 U8.2 | length 121.1
  Top Layer w0.6: v2(-102.87,12.279) -102.87,15.327 -100.584,17.613 -100.584,34.377 -92.075,42.886 -92.075,88.225 -88.85,91.45 -83.8,91.45 -82.931,90.581 v1(-82.931,85.05)
  Bottom Layer w0.3: v1(-82.931,85.05) -82.931,79.726 U4.28@-77.041,73.836
  Bottom Layer w0.6: U8.2@-110.008,13.803 -104.742,13.803 -103.218,12.279 v2(-102.87,12.279) R37.2@-102.87,9.393
NetR38_1: R38.1 R39.1 U4.10 | length 89
  Top Layer w0.6: v1(-86.5,108.925) -60.325,82.75 -60.325,61.85 -61.8,60.375 v1(-64.45,60.375)
  Bottom Layer w0.3: U4.10@-71.384,67.472 -68.326,64.414 -68.326,62.698 -66.003,60.375 v1(-64.45,60.375)
  Bottom Layer w0.6: v1(-86.5,108.925) -86.487,108.938 -86.487,121.88
  Bottom Layer w1: R38.1@-87.757,121.88 -86.487,121.88 R39.1@-85.217,121.88
NetR43_1: R43.1 U9.7 | length 4.6
  Bottom Layer w0.5: R43.1@-119.219,62.19 -119.219,62.04 -118.607,61.428
  Bottom Layer w0.6: -118.607,61.428 U9.7@-115.036,61.428
NetR44_1: R44.1 U10.7 | length 5.4
  Bottom Layer w0.5: R44.1@-120.108,125.944 -120.108,125.794 -119.623,125.309
  Bottom Layer w0.6: -119.623,125.309 U10.7@-115.036,125.309
NetR45_2: R45.2 TP41.1 U8.5 | length 10.8
  Bottom Layer w0.5: R45.2@-121.123,11.898 -121.123,10.373 -119.6,8.85 v2(-114.935,8.85) -114.935,11.234 -114.964,11.263 U8.5@-115.036,11.263
NetR46_2: R46.2 TP51.1 U4.30 U9.2 | length 78.4
  Top Layer w0.6: TP51.1@-102.87,59.904 -102.87,70.155 -93.853,79.172 -93.853,89.547 -89.675,93.725 -83.225,93.725 -80.518,91.018 v1(-80.518,85.05)
  Bottom Layer w0.3: v1(-80.518,85.05) -80.518,78.727 U4.30@-76.334,74.543
  Bottom Layer w0.6: U9.2@-110.008,61.428 -104.394,61.428 TP51.1@-102.87,59.904 R46.2@-102.87,57.018
  other v2: -102.87,59.968
NetR47_2: R47.2 R80.2 U4.21 U9.3 U11.3 | length 87.4
  Top Layer w0.6: v1(-106.172,58.888) v1(-106.172,44.283) -102.997,41.108 v1(-102.997,36.409) ; v1(-90.678,37.679) -84.9,43.457 v1(-84.9,50.506)
  Bottom Layer w0.3: v1(-84.9,50.506) -83.947,51.459 -83.947,62.688 U4.21@-77.041,69.594
  Bottom Layer w0.6: U11.3@-110.008,44.41 -106.353,44.41 -106.226,44.283 v1(-106.172,44.283) R80.2@-106.172,41.27 ; U9.3@-110.008,60.158 -107.442,60.158 v1(-106.172,58.888) ; R47.2@-106.172,57.018 v1@-106.172,58.942 ; v1(-102.997,36.409) -91.948,36.409 v1(-90.678,37.679)
NetR49_2: R49.2 TP52.1 U4.29 U10.2 | length 74.3
  Top Layer w0.6: v2(-102.87,124.166) -102.87,118.495 -98.254,113.879 v1(-93.853,113.879) ; v1(-81.661,85.05) -81.643,85.068 -81.643,90.132 v1(-81.625,90.15)
  Bottom Layer w0.3: v1(-81.661,85.05) -81.661,79.163 U4.29@-76.688,74.19
  Bottom Layer w0.6: U10.2@-110.008,125.309 -104.064,125.309 -102.921,124.166 v2(-102.87,124.166) R49.2@-102.87,120.899 ; v1(-93.853,113.879) -81.625,101.651 v1(-81.625,90.15)
NetR50_2: R50.2 R82.2 U4.22 U10.3 U12.3 | length 116.4
  Top Layer w0.6: v1(-107.823,108.291) v1(-107.823,124.039) ; v1@-85.325,90.096 -85.325,58.675 v1(-84.8,58.15)
  Bottom Layer w0.3: v1(-84.8,58.15) -84.709,58.241 -84.709,62.633 U4.22@-77.395,69.947
  Bottom Layer w0.6: U10.3@-110.008,124.039 v1(-107.823,124.039) -106.523,124.039 -106.172,123.688 R50.2@-106.172,120.899 ; R82.2@-106.172,105.151 -106.172,107.94 -106.523,108.291 v1(-107.823,108.291) U12.3@-110.008,108.291 -111.711,108.291 -111.887,108.115 -111.887,103.049 -109.89,101.052 -94.234,101.052 -85.325,92.143 v1(-85.325,90.15)
NetR51_2: R51.2 TP55.1 U9.5 | length 21.1
  Top Layer w0.6: v2(-120.269,66.889) -118.933,68.225 -116,68.225 -114.8,67.025 -114.8,61.375 -117.287,58.888 v1(-118.11,58.888)
  Bottom Layer w0.5: R51.2@-119.599,59.269 -119.599,59.241 R51.2@-119.246,58.888
  Bottom Layer w0.6: R51.2@-119.084,58.888 v1(-118.11,58.888) U9.5@-115.036,58.888
NetR52_2: R52.2 TP56.1 U10.5 | length 15.1
  Top Layer w0.6: v4(-120,130) -120,128.025 -116.475,124.5 -116.475,123.076 -116.826,122.725 -117.412,122.725 -117.418,122.731 -118.072,122.731 v1(-118.11,122.769)
  Bottom Layer w0.6: R52.2@-119.98,122.769 v1(-118.11,122.769) U10.5@-115.036,122.769
  other v2: -120,130
NetR62_1: R62.1 R69.2 TP7.1 U4.15 | length 109.7
  Top Layer w0.6: v1(-66.6,54.725) -66.572,54.697 -62.053,54.697 -56.134,60.616 -56.134,80.859 -30.48,106.513 v2(-18.161,106.513)
  Bottom Layer w0.3: U4.15@-74.92,67.472 -78.613,63.779 -78.613,60.488 -72.85,54.725 v1(-66.6,54.725)
  Bottom Layer w0.8: R62.1@-18.161,104.135 v2(-18.161,106.513) R69.2@-18.161,109.12
NetR64_1: R64.1 R70.2 TP8.1 U4.14 | length 91.3
  Top Layer w0.6: v1(-66.6,56) -66.567,55.967 -62.033,55.967 -57.189,60.811 -57.189,82.111 -37.91,101.39 v2(-37.91,106.675)
  Bottom Layer w0.3: U4.14@-74.566,67.119 -74.566,67.115 -77.8,63.882 -77.8,60.95 -72.817,55.967 -66.633,55.967 v1(-66.6,56)
  Bottom Layer w0.6: R70.2@-37.973,109.272 -37.878,109.177 -37.878,106.707 v2(-37.91,106.675) -37.91,104.141 R64.1@-37.846,104.078
NetR75_1: R75.1 U11.7 | length 4.5
  Bottom Layer w0.5: R75.1@-119.092,46.442 -118.892,46.242 -118.892,45.973 -118.599,45.68
  Bottom Layer w0.6: -118.599,45.68 U11.7@-115.036,45.68
NetR78_1: R78.1 U12.7 | length 5.6
  Bottom Layer w0.5: U12.7@-115.065,109.59 U12.7@-115.036,109.561
  Bottom Layer w0.6: R78.1@-120.108,110.831 -118.618,110.831 -117.377,109.59 U12.7@-115.065,109.59
NetR79_2: R79.2 TP61.1 U4.33 U11.2 | length 82.9
  Top Layer w0.6: v2(-102.87,44.029) -102.87,56.475 -98.933,60.412 -98.933,68.667 v1(-94.615,72.985)
  Bottom Layer w0.3: v1(-94.615,72.985) -94.615,82.764 -91.186,86.193 -77.235,86.193 -77.059,86.017 -77.059,77.39 U4.33@-75.273,75.604
  Bottom Layer w0.6: U11.2@-110.008,45.68 -104.521,45.68 v2(-102.87,44.029) R79.2@-102.87,41.27
NetR81_2: R81.2 TP62.1 U4.32 U12.2 | length 60
  Top Layer w0.6: v2(-102.87,108.164) -98.081,103.375 -89.375,103.375 -77.978,91.978 v1(-77.978,85.05)
  Bottom Layer w0.3: v1(-77.978,85.05) -77.978,77.602 U4.32@-75.627,75.251
  Bottom Layer w0.6: U12.2@-110.008,109.561 -104.362,109.561 -102.965,108.164 v2(-102.87,108.164) R81.2@-102.87,105.151
NetR91_1: R91.1 R95.2 TP17.1 U4.17 | length 92.1
  Top Layer w0.6: v1(-80,56.9) -78.375,56.9 -63.853,42.378 -31.75,42.378 v2(-18.415,29.043)
  Bottom Layer w0.3: v1(-80,56.9) -80.9,57.8 -80.9,62.906 U4.17@-75.627,68.179
  Bottom Layer w0.8: R95.2@-18.432,26.428 -18.424,26.437 -18.424,29.034 v2(-18.415,29.043) R91.1@-18.415,31.548
NetR92_1: R92.1 R96.2 TP18.1 U4.16 | length 71.7
  Top Layer w0.6: v1(-78.232,54.062) -65.151,40.981 -49.911,40.981 v2(-37.973,29.043)
  Bottom Layer w0.3: v1(-78.232,54.062) -79.35,55.18 -79.35,63.749 U4.16@-75.273,67.826
  Bottom Layer w0.6: R96.2@-37.973,26.411 -37.973,31.421 R92.1@-37.846,31.548
NetR103_2: R103.2 TP65.1 U11.5 | length 10.2
  Bottom Layer w0.5: R103.2@-121.25,43.775 -121.25,43.624 -118.353,40.727 v2(-114.935,40.727) -114.935,43.111 -114.964,43.14 U11.5@-115.036,43.14
NetR104_2: R104.2 TP66.1 U12.5 | length 10.1
  Bottom Layer w0.5: R104.2@-121.504,107.529 -121.504,107.378 -121.151,107.025 -121,107.025 -118.583,104.608 v2(-115.062,104.608) ; TP66.1@-115.036,104.634 U12.5@-115.036,107.021
NetRP1_2: RP1.2 TP2.1 U2.4 | length 11.6
  Bottom Layer w1: RP1.2@-41.496,63.752 -38.486,66.762 -35.847,66.762 -34.755,65.67 U2.4@-31.641,65.67
V_BAT: D28.1 D33.1 D35.1 D37.1 D39.1 D41.1 D43.1 D45.1 J12.2 J13.1 VT1.D VT2.D VT5.D VT7.D VT8.D VT9.D VT13.D VT14.D | length 671.2
  Top Layer w2: VT7.D@-155.702,13.041 VT7.D@-135.509,13.041 ; VT1.D@-155.702,29.043 VT1.D@-135.509,29.043 ; VT13.D@-155.702,45.045 VT13.D@-135.509,45.045 ; VT8.D@-155.702,60.92 VT8.D@-135.509,60.92 ; VT5.D@-155.702,76.922 VT5.D@-135.509,76.922 ; VT14.D@-155.702,108.926 VT14.D@-135.509,108.926 ; VT9.D@-155.702,124.801 VT9.D@-135.509,124.801 ; VT2.D@-155.575,92.924 VT2.D@-135.382,92.924 ; J12.2@-14.097,65.071 -12.736,66.432 J13.1@-6.35,66.432
  Bottom Layer w2: D39.1@-155.817,98.639 -141.097,98.639 VT2.D@-135.509,93.051 ; D33.1@-155.702,18.629 -141.097,18.629 VT7.D@-135.509,13.041 VT1.D@-135.509,29.043 ; D37.1@-155.702,50.76 -141.224,50.76 VT13.D@-135.509,45.045 ; D35.1@-155.702,66.635 -141.224,66.635 VT8.D@-135.509,60.92 ; D28.1@-155.69,34.758 -141.224,34.758 VT1.D@-135.509,29.043 ; D45.1@-155.69,114.641 -136.681,114.641 -135.509,115.813 VT9.D@-135.509,124.801 ; D43.1@-155.69,130.389 -149.987,130.389 -144.399,124.801 VT9.D@-135.509,124.801 ; D41.1@-155.563,82.637 -141.224,82.637 VT5.D@-135.509,76.922 ; VT14.D@-135.509,108.926 VT2.D@-135.509,93.051 ; VT2.D@-135.382,92.924 VT2.D@-135.509,93.051 ; J12.2@-14.097,65.071 -12.736,66.432 J13.1@-6.35,66.432 -2.572,66.432 -1.4,67.603 -1.4,131.05 -3.95,133.6 -129.9,133.6 -135.366,128.134 -135.366,124.944 VT9.D@-135.509,124.801 ; VT1.D@-135.509,29.043 VT13.D@-135.509,45.045 ; VT13.D@-135.509,45.045 VT8.D@-135.509,60.92 ; VT8.D@-135.509,60.92 VT5.D@-135.509,76.922 ; VT5.D@-135.509,76.922 VT2.D@-135.509,93.051
VCC: C3.2 C5.1 C29.1 C30.1 C31.1 C32.1 C33.1 C34.1 C35.1 C36.1 D1.2 D2.2 D6.2 D10.2 D11.2 D12.2 D19.2 D20.2 J1.2 L1.2 RG1.1 RP1.1 U5.1 U6.1 U7.1 U8.1 U9.1 U10.1 U11.1 U12.1 | length 415.9
  Top Layer w1: RP1.1@-41.534,66.254 -41.534,81.62 -40.948,82.206 L1.2@-34.798,82.206
  Top Layer w2: v1(-105.664,14.946) -105.65,14.96 v1(-105.65,30.825) -105.65,40.205 -108,42.555 v1(-108,46.962) -108,59.9 v1(-105.25,62.65) -105.156,62.744 v1(-105.156,78.954) -105.156,85.558 -99.949,90.765 -99.949,95.974 v1(-101.5,97.525) v1(-101.5,97.525) -105.41,101.433 v5(-105.41,110.85) v1(-105.41,126.579) -105.41,126.833 -99.695,132.548 -11.557,132.548 -9.525,130.516 v1(-9.525,125.436) ; L1.2@-34.798,82.206 -24.638,82.206 ; RG1.1@-27.559,95.972 -27.543,95.956 -27.035,95.956 -26.797,95.718 -24.638,95.718 ; C3.2@-16.383,94.823 C3.2@-16.383,95.591 ; C5.1@-15.05,80.732 -16.1,80.732 -16.1,81.034 -17.272,82.206 -24.638,82.206 ; J1.2@-6.35,94.448 -7.493,95.591 C3.2@-16.383,95.591 ; -24.638,82.206 -24.638,95.718 ; -24.638,95.718 -16.383,95.718 C3.2@-16.383,95.591
  Bottom Layer w0.6: U8.1@-110.008,15.073 -105.845,15.073 -105.718,14.946 v1(-105.664,14.946) -103.632,14.946 -102.902,15.676 D10.2@-102.902,18.756 ; U5.1@-110.008,30.821 C31.1@-108.47,30.821 ; U11.1@-110.008,46.95 -110.002,46.956 -108.006,46.956 v1(-108,46.962) -107.988,46.95 -103.686,46.95 -103.029,47.607 D19.2@-103.029,50.76 ; U9.1@-110.008,62.698 -108,62.698 -107.982,62.68 -105.28,62.68 v1(-105.25,62.65) -103.523,62.65 -103.124,63.049 D11.2@-103.124,66.127 ; U7.1@-110.008,78.954 C32.1@-108,78.954 ; U6.1@-110.008,94.702 -105.283,94.702 -103.886,96.099 -103.886,98.089 D2.2@-103.336,98.639 ; U12.1@-110.008,110.831 C36.1@-108.077,110.831 ; U10.1@-110.008,126.579 v1(-105.41,126.579) -103.507,126.579 -103.029,127.057 D12.2@-103.029,130.389 ; C31.1@-108.077,30.833 -108.073,30.829 -105.654,30.829 v1(-105.65,30.825) -105.646,30.821 -103.235,33.232 -103.235,34.081 -103.066,34.25 D1.2@-103.029,34.25 ; C32.1@-107.95,78.954 -107.944,78.96 -105.162,78.96 v1(-105.156,78.954) -103.507,78.954 -103.029,79.432 D6.2@-103.029,82.51 ; C36.1@-107.569,110.831 -103.475,110.831 -103.124,111.182 D20.2@-103.124,114.768 ; D2.2@-103.029,98.639 -102.629,98.639 -101.515,97.525 v1(-101.5,97.525)
  Bottom Layer w2: v1(-9.525,125.436) -6.35,122.261 J1.2@-6.35,94.448
  other v2: -9.525,125.436

## Polygon pours and split planes (outlines as drawn)
GND on Top Layer "NONET_L01_P002" (solid, shelved, pour order 2): 0,135 0,0 -200.025,0 -200.025,135
GND on Top Layer "NONET_L01_P001" (solid, shelved, pour order 1): -84.709,82.637 -62.23,82.637 -62.23,58.888 -84.709,58.888
GND on Bottom Layer "NONET_L02_P003" (solid, remove dead copper, shelved, pour order 3): 0,0 0,135 -200.025,135 -200.025,0
V_BAT on Bottom Layer "NONET_L02_P000" (solid, shelved, pour order 0): -152.527,133.691 -131.699,133.691 -131.699,2.5 -152.654,2.5

## Silkscreen, mask and mechanical layers (free items; w line width, h text height)
Top Overlay:
  lines w0.254: -22.479,26.757 -22.352,26.757 -22.225,26.884
  text "+ GND" at -38.8,132.175 h1.62
  text "+ GND" at -47.25,132.1 h1.62
  text "+ GND" at -18.55,131.925 h1.62
  text "+ GND" at -26.9,131.8 h1.62
  text "GND" at -84.575,129.575 h1.24 r90
  text "RX" at -75.819,129.5 h1.52 r90
  text "TX" at -73.152,129.5 h1.24 r90
  text "DIR" at -70.739,129.5 h1.24 r90
  text "B" at -64.136,129.419 h1.62
  text "A" at -54.136,129.419 h1.62
  text "+5V" at -78.359,129.373 h1.52 r90
  text "GND" at -68.129,129.379 h1.24 r90
  text "5V" at -89.535,129.292 h1.24 r90
  text "TIM" at -86.995,129.292 h1.24 r90
  text "5V" at -97.917,129.246 h1.24 r90
  text "INT" at -95.377,129.246 h1.24 r90
  text "GND" at -57.525,129.1 h1.62 r90
  text "GND" at -92.775,129.05 h1.52 r90
  text "+" at -82.046,128.988 h1.25
  text "H" at -198.501,122.515 h1 r90
  text "GND" at -49.675,114.45 h1.25 r90
  text "RX_1" at -52.277,114.387 h1.24 r90
  text "3.3v" at -62.611,114.26 h1.24 r90
  text "DIO" at -59.69,114.26 h1.52 r90
  text "CLC" at -57.15,114.26 h1.52 r90
  text "TX_1" at -54.69,114.26 h1.24 r90
  text "L" at -199.39,110.831 h1 r270
  text "DIO" at -59.817,97.242 h1.52 r90
  text "GND" at -54.6,97.05 h1.5 r90
  text "CLC" at -57.277,96.988 h1.52 r90
  text "SCL" at -48.387,96.988 h1.5 r90
  text "SDA" at -45.847,96.988 h1.5 r90
  text "GND" at -51.15,96.975 h1.5 r90
  text "3.3v" at -62.484,95.464 h1.52 r90
  text "3.3v" at -43.307,95.464 h1.5 r90
  text "VCC" at -0.635,93.686 h1 r90
  text "H" at -198.509,90.598 h1 r90
  text "GND" at -0.762,87.463 h1 r90
  text "L" at -199.398,78.914 h1 r270
  text "GND" at -0.635,70.572 h1 r90
  text "BAT" at -0.762,65.111 h1 r90
  text "POW" at -0.889,60.158 h1 r90
  text "H" at -198.501,57.999 h1 r90
  text "GND" at -0.762,54.824 h1 r90
  text "L" at -199.39,46.315 h1 r270
  text "GND" at -0.381,37.679 h1 r90
  text "+5V" at -0.381,30.44 h1 r90
  text "H" at -198.501,26.63 h1 r90
  text "CLEAR" at -90.551,22.185 h1.52
  text "STOP" at -72.263,22.185 h1.52
  text "START" at -55.372,21.677 h1.52
  text "L" at -199.39,14.946 h1 r270
  text "GND" at -66.104,12.354 h1.24 r90
  text "CLEAR" at -63.373,12.152 h1.24 r90
  text "STOP" at -60.833,12.152 h1.24 r90
  text "START" at -58.293,12.152 h1.24 r90
  text "5v" at -55.626,12.152 h1.24 r90
  text "3.3v" at -53.213,12.025 h1.24 r90
  text "-" at -84.324,9.987 h1.25 r180
  text "5v" at -73.914,8.723 h1.24 r90
  text "+ GND" at -19,3.15 h1.62 r180
  text "+ GND" at -10.875,3.1 h1.5 r180
  text "+ GND" at -30.6,3.05 h1.62 r180
  text "+ GND" at -39.175,2.875 h1.62 r180
Mechanical 1:
  lines w0.254: -5,0 ccw(c-5,5) 0,5 0,130 ccw(c-5,130) -4.973,135 -195,135 ccw(c-195,130) -200,130 -200,5 ccw(c-195,5) -195,0 -4.975,0

## Text inside footprints (layer, text, board x,y; h text height)
LED1: Top Overlay "K" at -20.955,112.609 h0.76 r90; Mechanical 15 "K" at -20.955,112.609 h0.76 r90
LED2: Top Overlay "K" at -40.513,112.604 h0.76 r90; Mechanical 15 "K" at -40.513,112.604 h0.76 r90
LED3: Top Overlay "K" at -23.495,23.074 h0.76 r270; Mechanical 15 "K" at -23.495,23.074 h0.76 r270
LED4: Top Overlay "K" at -43.053,23.074 h0.76 r270; Mechanical 15 "K" at -43.053,23.074 h0.76 r270
SW1: Top Overlay "*" at -81.217,24.344 h1.27 r180; Mechanical 13 "*" at -84.315,26.16 h1.27 r180
SW2: Top Overlay "*" at -45.911,24.344 h1.27 r180; Mechanical 13 "*" at -49.009,26.16 h1.27 r180
SW3: Top Overlay "*" at -63.564,24.344 h1.27 r180; Mechanical 13 "*" at -66.662,26.16 h1.27 r180
U5: Bottom Overlay "*" at -109.437,31.252 h1.27; Mechanical 13 "*" at -110.592,30.072 h1.27
U6: Bottom Overlay "*" at -109.437,95.133 h1.27; Mechanical 13 "*" at -110.592,93.953 h1.27
U7: Bottom Overlay "*" at -109.437,79.385 h1.27; Mechanical 13 "*" at -110.592,78.205 h1.27
U8: Bottom Overlay "*" at -109.437,15.504 h1.27; Mechanical 13 "*" at -110.592,14.324 h1.27
U9: Bottom Overlay "*" at -109.437,63.129 h1.27; Mechanical 13 "*" at -110.592,61.949 h1.27
U10: Bottom Overlay "*" at -109.437,127.01 h1.27; Mechanical 13 "*" at -110.592,125.83 h1.27
U11: Bottom Overlay "*" at -109.437,47.381 h1.27; Mechanical 13 "*" at -110.592,46.201 h1.27
U12: Bottom Overlay "*" at -109.437,111.262 h1.27; Mechanical 13 "*" at -110.592,110.082 h1.27